# EAGLE board census (EAGLE 9.6.2)
Census board: a small sensor carrier.
AUTHOR: Census; REVISION: B
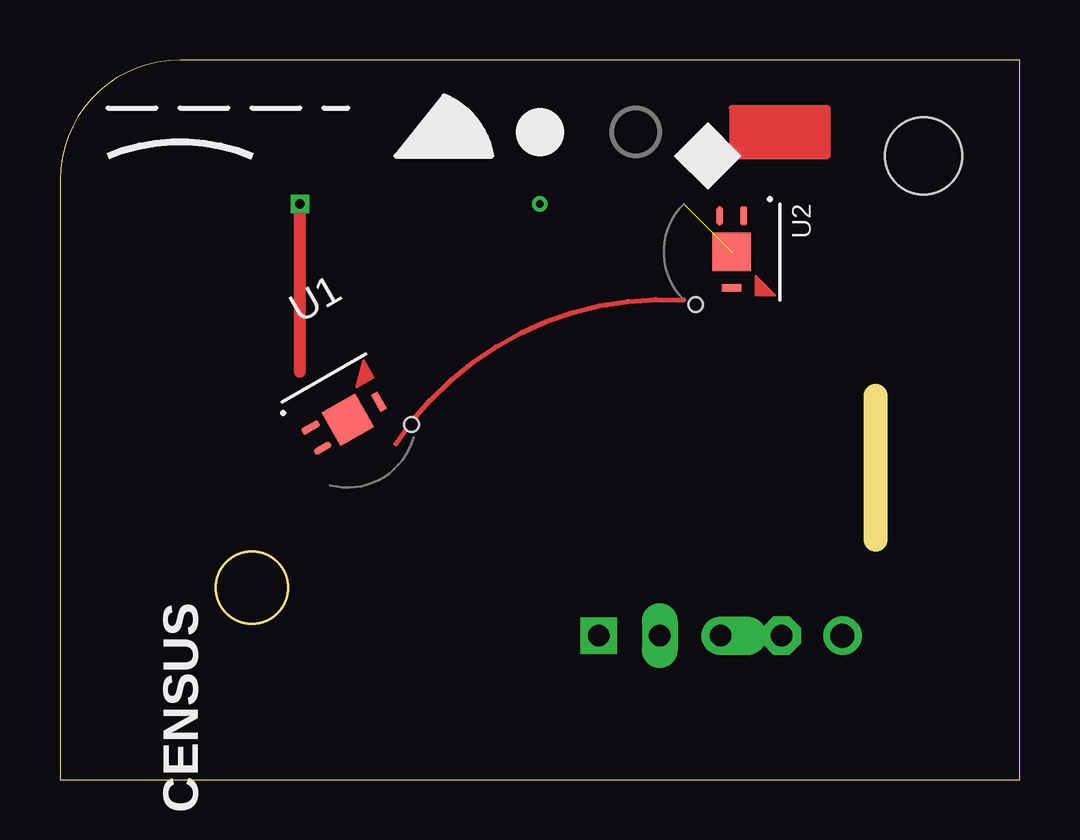
[diagram p0: board, top side]
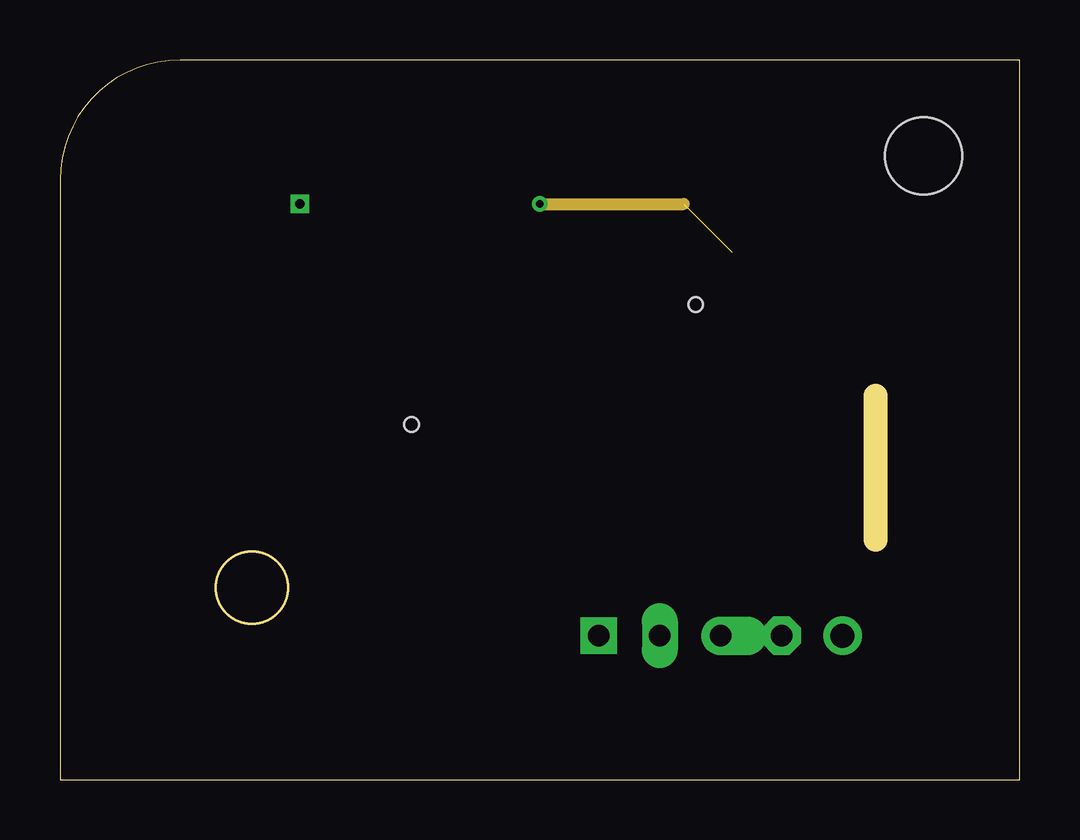
[diagram p1: board, inner layer Route2]
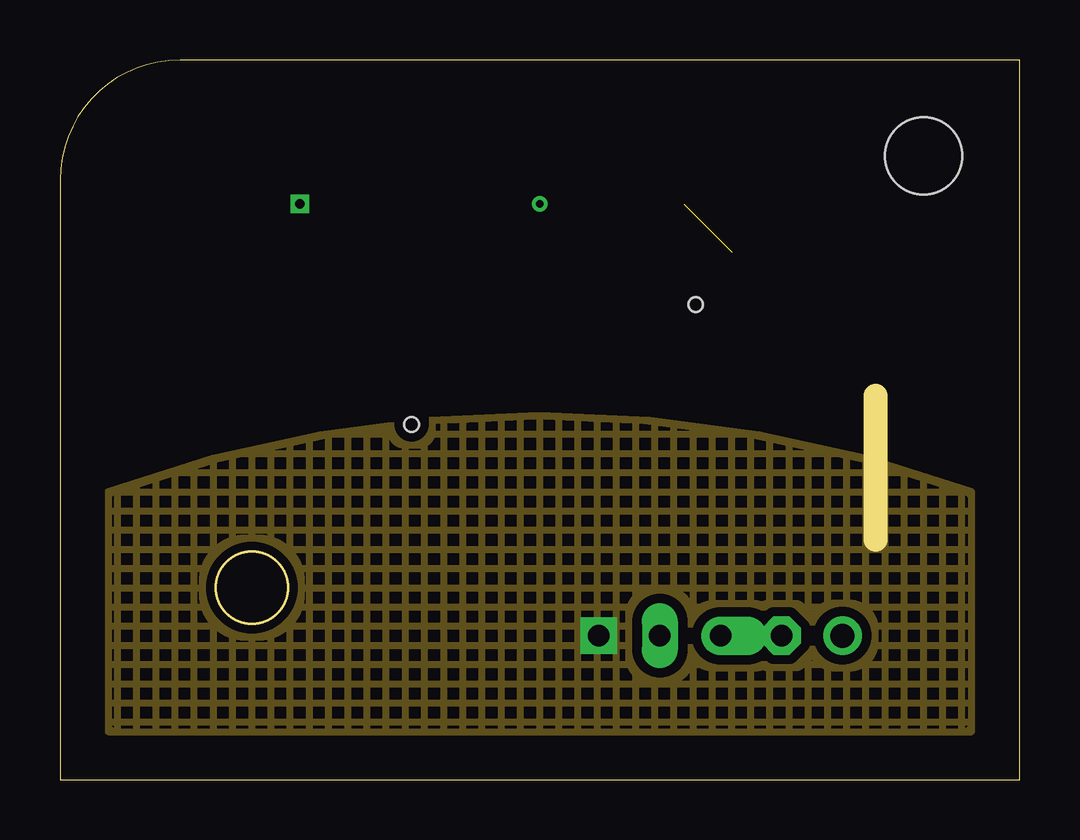
[diagram p2: board, inner layer Route15]
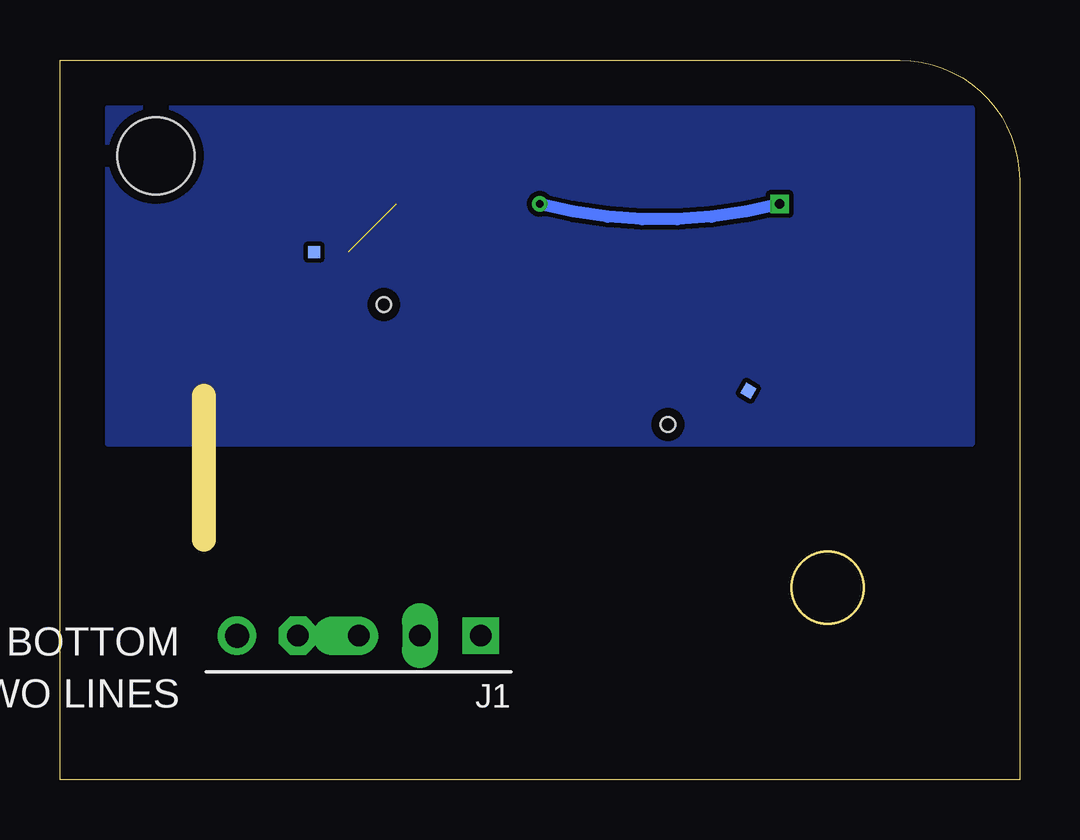
[diagram p3: board, bottom side, seen from below]

Size 40 x 30 mm. Coordinates in mm from the lower left corner, seen from the top.
Outline: 0,0 40,0 40,30 5,30 arc90 0,25 0,0
Outline: circle at 8,8 radius 1.5
Copper layers (1*2*15*16): Top 0.035mm / dielectric 0.2mm / Route2 0.0175mm / dielectric 0.15mm / Route15 0.0175mm / dielectric 1.2mm / Bottom 0.035mm
Design rules "census-rules": minimum track width 6mil, minimum drill 12mil, track to track 7mil, track to pad 8mil, pad to pad 9mil, via to via 8mil, smd to smd 6mil, copper to edge 15mil, drill to drill 10mil, minimum pad ring 12mil, minimum via ring 7mil, stop-mask expansion 3mil, vias tented up to drill 14mil, thermal gap 12mil
Net classes: 0 default: width 0.2 mm, drill 0.3 mm, clearance 0.2 mm; 1 power: width 0.5 mm, drill 0.4 mm, clearance 0.35 mm to class 0, clearance 0.3 mm
Holes 3.2 mm at 36,26
tRestrict: area 14,2 to 18,6
bRestrict: area 16,8 to 18,10
vRestrict: area 20,2 to 22,4
Milling: 1 lines

## Footprints (pad centres in the part's own frame; a part is rotated, then mirrored left to right if it is on the bottom)
TH-CENSUS = drill 0.9 pad 1.2 square: 1 -2.54,0 | drill 0.9 long: 2 0,0 | drill 0.9 pad 1.6 offset: 3 2.54,0 | drill 0.9 pad 1.6 octagon: 4 5.08,0 | drill 1: 5 7.62,0
QFN-CENSUS = smd 0.8 x 0.3: 1 -1.5,0.5; 2 -1.5,-0.5 | smd 0.3 x 0.8: 3 1.5,0 | smd 0.5 x 0.5 bottom: B1 0,1.4 | smd 1.6 x 1.6: EP 0,0 | hole 0.6: 2.2,-1.5

## Placement (x,y rotation side)
J1  HDR  [TH-CENSUS]  25,6 180 bottom  (not fitted)
U1  CS-100  [QFN-CENSUS]  12,15 30 top
U2  CS-100  [QFN-CENSUS]  28,22 270 top

## Library data of the parts
J1 U2 = census-lib
U1 = census-lib; MPN: CS-100-QFN; TOLERANCE: 1%

## Nets
GND: J1.3 J1.4 J1.5 U1.EP U2.EP
SENSE: U1.2 U2.2
VCC [power]: J1.1 U1.1 U2.1

## Tracks (layer width: path | path; a pad name or v marks a point on that pad's centre or on a via)
GND
  pour Bottom: 2,14 38,14 38,28 2,28
SENSE
  Top 0.2: 14,14 arc-60 26,20
VCC  (via drill 0.3 pad 0.5, 0.4)  (1 unrouted)
  Top 0.5: 10,17 v10,24
  Route2 0.5: v20,24 26,24
  Bottom 0.5: v10,24 arc30 v20,24
  pour Route15 (isolate 0.4, rank 2, no thermals, hatched): 2,2 38,2 38,12 arc40 2,12
(copper drawn outside any net)
  shapes: Bottom area x1, Top area x1

## Text on the board
tPlace: CENSUS
bPlace: BOTTOM / TWO LINES
Logo: LOGO